# Altium PCB BRD9057A_SiWx917M_4-Layer_ExtSw_REF_DES_A01.PcbDoc (part 3 of 3)
Units mm, origin at the board's own origin, x right, y up, seen from the top; angles counter-clockwise.
Board outline 30 x 45 mm, 4 copper layers (Top Layer, Signal Layer 2, Signal Layer 3, Bottom Layer), stack 1.527 mm thick; 95 components, 97 nets, 386 pads, 413 vias.
Unrouted connection lines stored in the file: 15.
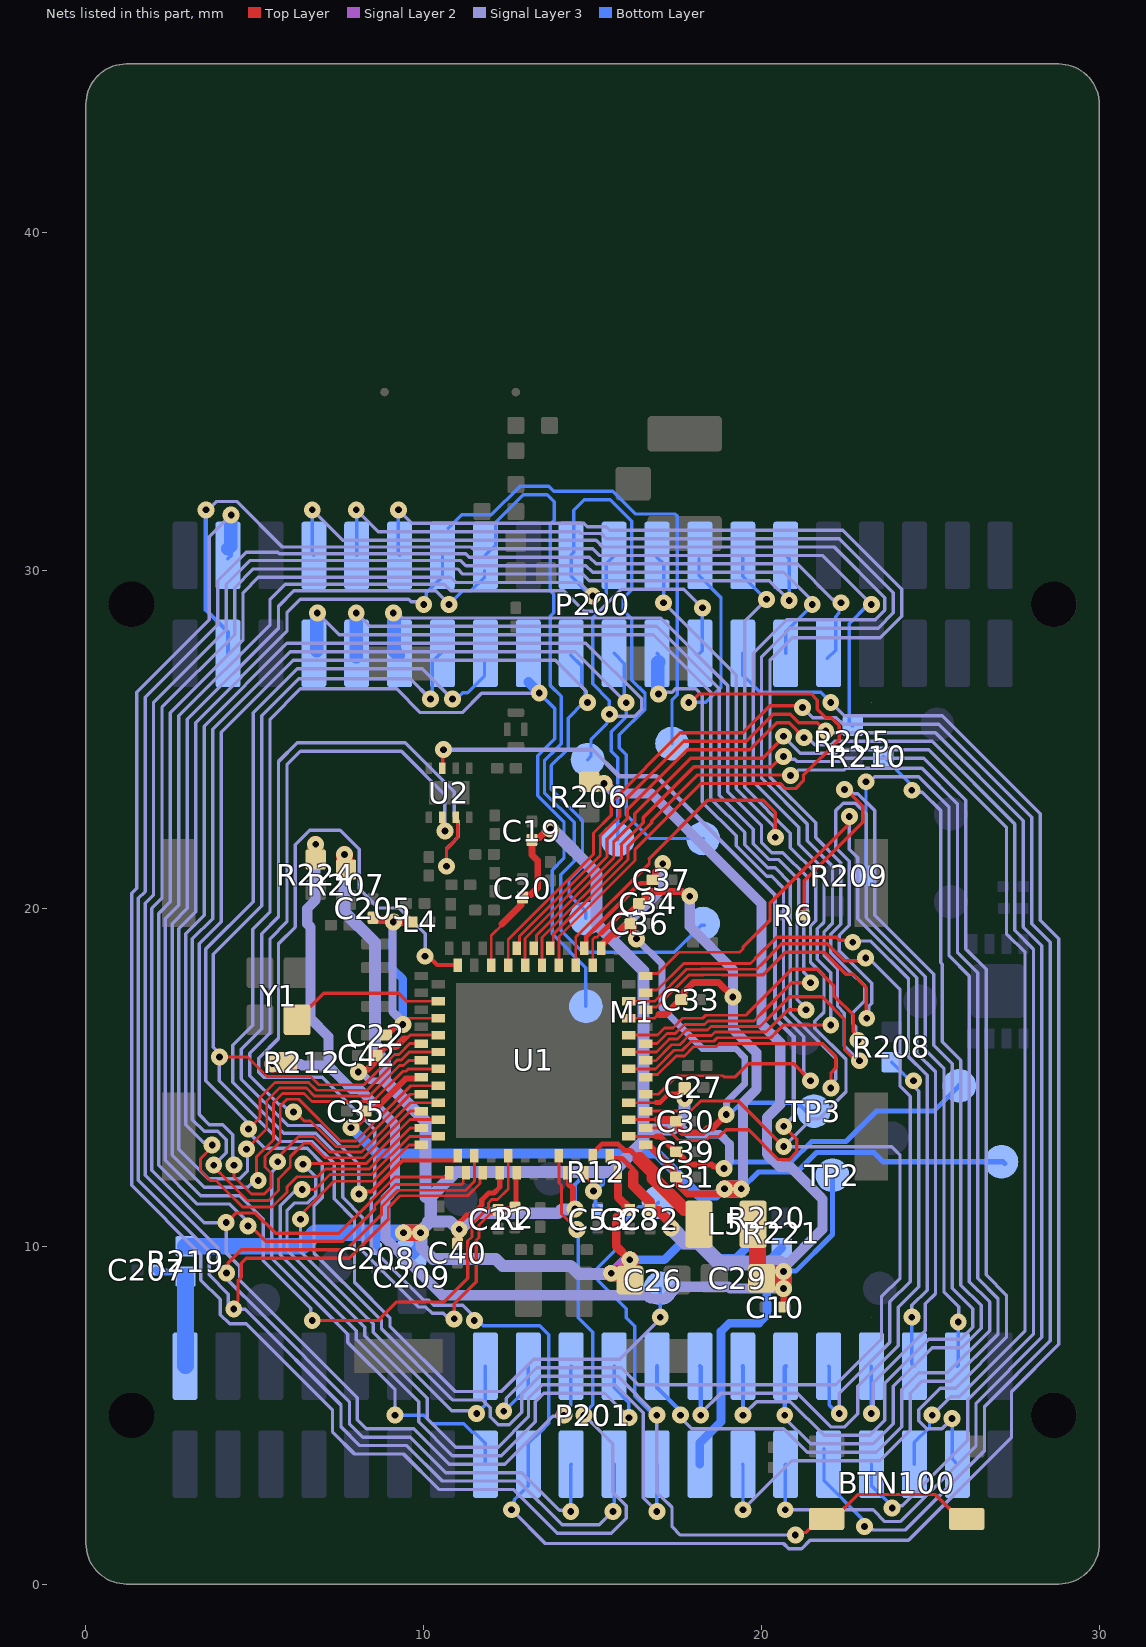
[diagram p4: the nets of this part, all layers, seen from the top]

## Via types
v1: diameter 0.5, hole 0.2, Top Layer to Bottom Layer, tented both sides, 372 vias
v2: diameter 0.5/0.5/0.5/0.5 (per signal layer), hole 0.2, Top Layer to Bottom Layer, tented both sides, 41 vias

## Nets (pads, with @x,y where several pads share a name; then routed paths per layer and width w, separated by ;. In a path a pad name is that pad's centre, name@x,y a point inside that pad or via, vN(x,y) a via of type N, cw(c..) or ccw(c..) an arc to the next point about the centre after c; other vN are vias at no path point) (continued)
NetU1_A19: U1.A19 U2.6 | length 23.3
  Top Layer w0.083: v1(6.145,13.975) 6.192,13.975 6.462,13.705 6.645,13.705 7.398,12.952 8.058,12.952 8.836,13.73 8.836,13.736 9.6,14.5 U1.A19@9.925,14.5
  Top Layer w0.1: U2.6@10.55,22.725 10.55,22.292 v1(10.627,22.292) v1@10.589,22.33 ; U2.6@10.575,22.7 U2.6@10.589,22.687
  Signal Layer 3 w0.1: v1(6.145,13.975) 6.037,13.975 5.829,14.184 5.716,14.184 4.85,15.05 4.85,15.717 5.45,16.317 5.45,19.1 5.95,19.6 5.95,24.25 6.35,24.65 9.341,24.65 10.627,23.364 v1(10.627,22.292)
NetU1_A35: U1.A35 U2.3 | length 25.5
  Top Layer w0.083: U1.A35@16.575,13.5 17.182,13.5 17.55,13.132 18.35,13.132 18.468,13.25 18.75,13.25
  Top Layer w0.1: U2.3@10.55,24.15 10.566,24.166 10.566,24.684 v1(10.583,24.701) ; 18.75,13.25 18.95,13.45 19.616,13.45 20.499,12.567 20.816,12.567 21.041,12.791 21.041,13.167 v1(20.658,13.55) v1@20.65,13.55
  Signal Layer 3 w0.127: v1@10.551,24.701 v1(10.583,24.701) 14.999,24.701 15.787,23.914 16.886,23.914 20.4,20.4 20.4,16.75 20.95,16.2 20.95,13.842 v1(20.658,13.55)
NetU1_B12: U1.B12 Y1.3 | length 4.6
  Top Layer w0.083: 9.499,17.25 U1.B12@10.425,17.25
  Top Layer w0.1: Y1.3@6.25,16.7 6.25,16.734 6.598,17.081 6.631,17.081 7.034,17.484 9.265,17.484 9.499,17.25
NetU1_B21: U1.B21 U2.7 | length 28.7
  Top Layer w0.1: v1(10.675,21.25) 10.675,21.775 11.01,22.11 11.01,22.45 11,22.46 11,22.65 U2.7@10.95,22.7
  Top Layer w0.127: v1(8.079,11.55) 8.151,11.621 8.455,11.621 9.373,12.538 10.938,12.538 11,12.6 U1.B21@11,12.675
  Signal Layer 3 w0.1: v1@8.1,11.55 8.079,11.571 8.079,12.421 6.925,13.575 5.975,13.575 4.6,14.95 4.6,15.834 5.2,16.434 5.2,19.25 5.7,19.75 5.7,24.35 6.25,24.9 9.45,24.9 10.9,23.45 10.9,22.725 11.025,22.6 11.025,22.459 11.027,22.457 11.027,22.126 10.793,21.892 10.675,21.775 v1(10.675,21.25)
POC_IN: C21.2 M1.TPJ17 P200.17 R2.2 U1.A27 | length 47.2
  Top Layer w0.083: 11.55,10.15 11.55,10.165 11.639,10.254 11.639,10.629 11.979,10.969 12.094,10.969 C21.2@12.2,11.075
  Top Layer w0.1: v1(10.9,7.85) 10.9,8.014 10.9,8.3 11.55,8.95 11.55,10.15
  Top Layer w0.15: C21.2@12.2,11.075 12.238,11.113 12.663,11.113 R2.2@12.7,11.15 ; R2.2@12.75,11.15 12.725,11.175 12.725,12.15 U1.A27@12.75,12.175
  Signal Layer 3 w0.1: v1(10.9,7.85) 10.823,7.927 10.665,7.927 10.577,8.014 10.252,8.014 10.066,8.2 9.85,8.2 8.2,9.85 8.2,10.85 7.6,11.45 7.6,12.55 6.8,13.35 5.85,13.35 4.35,14.85 4.35,15.95 4.937,16.537 4.937,19.386 5.45,19.9 5.45,25.6 6.35,26.5 9.2,26.5 9.9,25.8 11.134,25.8 11.71,26.375 v1@13.419,26.375
  Bottom Layer w0.1: v1(13.419,26.375) 13.875,25.919 13.875,25.025 13.373,24.523 13.373,23.342 14.15,22.566 14.15,21.484 13.8,21.134 13.8,19.25 14.801,18.249 M1.TPJ17@14.801,17.101
  Bottom Layer w0.3: P200.17@13.1,26.7 13.419,26.381 v1(13.419,26.375)
RADIO_F0: M1.TPJ1 P200.13 U1.A16 | length 46
  Top Layer w0.083: v1(3.95,15.6) 4.786,15.6 5.361,15.025 6.653,15.025 6.896,14.783 8.233,14.783 9.13,15.68 9.267,15.68 9.587,16 U1.A16@9.925,16
  Signal Layer 3 w0.1: v1(10.2,26.2) 9.6,26.8 6.3,26.8 5.2,25.7 5.2,20.085 3.763,18.648 3.763,15.895 3.95,15.708 v1(3.95,15.6) 3.95,14.9 5.75,13.1 6.7,13.1 7.35,12.45 7.35,11.4 7.95,10.8 7.95,9.1 7.95,8.934 9,7.884 9,7.634 10.934,5.7 12.3,5.7 13.25,6.65 15.8,6.65 17,7.85 v1(17,7.9)
  Bottom Layer w0.1: v1(10.2,26.2) 10.254,26.254 10.254,27.304 P200.13@10.55,27.6 ; v1(17,7.9) M1.TPJ1@17,8.752
RADIO_F1: M1.TPJ2 P200.14 U1.A17 | length 47.8
  Top Layer w0.083: v1(4.75,12.875) 5.35,13.475 5.35,14.3 5.734,14.684 6.525,14.684 6.758,14.451 8.385,14.451 9.282,15.348 9.404,15.348 9.557,15.5 U1.A17@9.925,15.5
  Signal Layer 3 w0.1: v1(4.75,12.875) 4.783,12.842 4.783,12.234 4.549,12 3.617,12 2.75,12.867 2.75,19.4 3.25,19.9 3.25,25.5 5.95,28.2 5.95,28.75 6.35,29.15 9.55,29.15 9.623,29.077 9.923,29.077 v1(10,29)
  Bottom Layer w0.1: v1(10,29) 10.077,29.077 10.077,29.342 10.555,29.82 P200.14@10.555,30.45 10.555,30.495 P200.14@10.55,30.5 ; P200.14@10.725,31.25 11.125,31.65 12,31.65 12.85,32.5 13.7,32.5 13.85,32.35 15.6,32.35 16.273,31.677 17.441,31.677 17.5,31.618 17.5,26.323 17.351,26.174 M1.TPJ2@17.351,24.881
RADIO_F2: BTN100.3 BTN100.4 M1.TPJ3 P200.15 U1.B15 | length 69.4
  Top Layer w0.083: v1(4.813,13.471) 5.15,13.808 5.15,14.4 5.6,14.85 6.593,14.85 6.827,14.617 8.317,14.617 9.214,15.514 9.335,15.514 9.572,15.75 U1.B15@10.425,15.75
  Top Layer w0.1: v1(21,1.45) 21.077,1.527 21.318,1.527 BTN100.3@21.717,1.925 ; BTN100.3@21.925,1.925 22.125,1.925 22.85,2.65 25.15,2.65 25.875,1.925 BTN100.4@26.075,1.925
  Signal Layer 3 w0.1: v1@4.779,13.437 4.779,13.412 5.29,12.9 6.55,12.9 7,12.45 7,11.432 6.75,11.182 6.75,9.8 8.536,8.014 8.75,7.8 8.75,7.55 10.85,5.45 11.733,5.45 11.967,5.216 11.967,4.951 12.201,4.717 12.533,4.717 12.9,5.084 12.9,5.617 13.433,6.15 15.75,6.15 v1(16.9,5) 16.9,2.716 17.066,2.55 17.35,2.266 17.35,1.7 17.6,1.45 v1(21,1.45) ; v1(4.813,13.471) 4.736,13.548 4.736,13.714 4.205,14.245 3.55,14.9 3.55,18.8 4.95,20.2 4.95,24.759 4.95,25.8 6.25,27.1 9.95,27.1 v1(10.85,26.2)
  Bottom Layer w0.1: v1(10.85,26.2) 10.958,26.2 11.149,26.391 11.296,26.391 11.8,26.895 P200.15@11.8,27.35 ; v1(16.9,5) 16.816,5 16.25,5.566 16.25,7.634 16,7.884 16,8.014 16,8.15 15.15,9 15.15,9.366 15.65,9.866 15.65,10.45 16.365,11.165 16.815,11.165 M1.TPJ3@16.949,11.3
RADIO_F3: M1.TPJ4 P200.16 U1.B16 | length 57.4
  Top Layer w0.083: v1(5.1,11.95) 5.05,12 5.05,12.65 5.55,13.15 5.55,14.25 5.818,14.518 6.456,14.518 6.689,14.285 8.485,14.285 9.382,15.182 9.473,15.182 9.541,15.25 U1.B16@10.425,15.25
  Signal Layer 3 w0.1: v1(5.1,11.95) 4.992,11.95 4.792,11.75 3.5,11.75 2.55,12.7 2.55,19.55 3,20 3,25.6 5.7,28.3 5.7,28.95 6.15,29.4 10.35,29.4 v1(10.75,29)
  Bottom Layer w0.1: v1(10.75,29) 11.15,29.4 11.392,29.4 11.8,29.808 P200.16@11.8,30 ; P200.16@11.825,30.45 12.13,30.755 12.13,31.43 12.95,32.25 13.65,32.25 13.862,32.038 13.862,31.486 13.75,31.374 13.75,29.4 13.85,29.3 13.85,28.75 13.75,28.65 13.75,26.6 14.075,26.275 14.075,24.875 13.959,24.759 13.573,24.373 13.573,23.452 13.575,23.45 ; 13.573,23.425 14.45,22.549 14.45,21.4 14.05,21 14.05,19.35 14.7,18.7 17.418,18.7 18.218,19.5 M1.TPJ4@18.3,19.5
RADIO_F6: M1.TPJ5 P200.19 U1.B17 | length 45.8
  Top Layer w0.083: v1(4.383,12.4) 4.383,12.067 4.9,11.55 5.28,11.55 5.475,11.745 5.475,12.17 5.3,12.345 5.3,12.655 5.75,13.105 5.75,14.15 5.95,14.35 6.3,14.35 7.532,13.118 7.989,13.118 8.67,13.799 8.67,13.805 9.616,14.75 U1.B17@10.425,14.75
  Signal Layer 3 w0.1: v1(4.383,12.4) 4.35,12.433 4.35,13.3 4.051,13.599 3.651,13.599 3.35,13.9 3.35,18.95 4,19.6 4,25.216 6.134,27.35 13.9,27.35 14.817,26.433 14.817,26.133 v1(14.85,26.1)
  Bottom Layer w0.1: P200.19@14.35,27.5 14.67,27.18 14.67,26.58 14.773,26.477 14.773,26.177 v1(14.85,26.1) 14.742,26.1 14.275,25.633 14.275,24.759 14.275,24.734 13.773,24.233 13.773,23.527 14.7,22.6 14.7,21.25 14.3,20.85 14.3,20.411 14.801,19.91 M1.TPJ5@14.801,19.702
RADIO_F7: M1.TPJ6 P200.20 U1.A24 | length 56.9
  Top Layer w0.083: 8.55,11.1 8.55,11.214 9.162,11.825 11.118,11.825 11.166,11.874 11.166,12.092 U1.A24@11.25,12.175
  Top Layer w0.1: v1(4.8,10.6) 4.866,10.6 5.316,10.15 7.6,10.15 8.55,11.1
  Signal Layer 3 w0.1: v1(4.8,10.6) 4.8,10.708 4.258,11.25 4.205,11.25 3.3,11.25 2.15,12.4 2.15,19.85 2.5,20.2 2.5,25.8 4.65,27.95 4.65,29.35 5.1,29.8 10.8,29.8 10.95,29.65 14.6,29.65 v1(15,29.25)
  Bottom Layer w0.1: P200.20@14.357,30.457 14.441,30.541 14.441,31.791 14.75,32.1 15.524,32.1 16.155,31.469 16.155,29.431 15.9,29.176 15.9,28.824 16.155,28.569 16.155,26.761 16.55,26.366 16.55,25.9 15.791,25.141 15.791,24.759 16,24.55 16,22.767 16.695,22.072 M1.TPJ6@18.27,22.072 ; P200.20@14.365,30.45 14.365,29.833 14.948,29.25 v1(15,29.25)
RADIO_F8: M1.TPJ7 P200.21 U1.A20 | length 42.3
  Top Layer w0.083: v1(3.783,12.4) 3.783,12.353 4.205,11.931 4.786,11.35 5.4,11.35 5.7,11.65 5.7,11.996 6.049,12.345 6.049,12.649 6.45,13.05 6.65,13.05 7.08,12.62 8.22,12.62 9.6,14 U1.A20@9.925,14
  Signal Layer 3 w0.1: v1(3.783,12.4) 4.15,12.767 4.15,13.15 3.901,13.399 3.501,13.399 3.15,13.75 3.15,19.1 3.75,19.7 3.75,25.3 6.05,27.6 14.485,27.6 v1(15.993,26.093)
  Bottom Layer w0.1: P200.21@15.635,27.55 15.937,27.248 15.937,26.063 v1@15.993,26.007 ; M1.TPJ7@15.74,22.031 15.74,24.46 15.55,24.65 15.55,24.759 15.55,25.233 15.993,25.676 v1@15.993,26.007 ; v1@16,26.1 v1(15.993,26.093) v1@15.993,26.007 ; v1@16.05,25.95 v1@15.993,26.007
RADIO_F9: M1.TPJ8 P200.22 U1.A21 | length 44.8
  Top Layer w0.083: v1(3.735,12.999) 3.735,12.935 3.392,12.592 3.392,12.238 3.679,11.95 3.85,11.95 4.205,11.595 4.643,11.157 5.507,11.157 5.95,11.6 5.95,11.761 6.245,12.055 6.855,12.055 7.088,12.288 8.387,12.288 9.599,13.5 U1.A21@9.925,13.5
  Signal Layer 3 w0.1: v1(3.735,12.999) 3.659,13.075 3.475,13.075 2.95,13.6 2.95,19.25 3.5,19.8 3.5,25.4 5.95,27.85 14.801,27.85 16.45,26.201 16.45,25.9 16.243,25.693 15.556,25.693 v1(15.5,25.749)
  Bottom Layer w0.1: M1.TPJ8@14.851,24.401 14.95,24.5 14.95,24.759 14.95,25 15.423,25.473 15.423,25.672 v1(15.5,25.749) ; v1(15.5,25.749) 15.497,25.753 15.497,26.15 15,26.646 15,28.604 15.4,29.004 15.4,30.2 P200.22@15.65,30.45
RADIO_F10: P200.23 U1.A37 | length 21.9
  Top Layer w0.083: U1.A37@16.575,14.5 16.955,14.5 17.505,15.05 18.859,15.05 18.859,15.046 18.903,15.003
  Top Layer w0.1: 18.901,15.008 19.208,15.008 19.6,15.4 20.949,15.4 v1(21.449,14.899)
  Signal Layer 3 w0.1: v1(16.95,26.35) 17.006,26.406 17.35,26.406 17.444,26.5 18.05,26.5 18.25,26.3 18.25,24.759 ; 18.25,24.75 18.25,23.15 19.25,22.15 19.25,21.851 20.151,20.95 20.3,20.95 20.65,20.6 20.65,16.802 21.25,16.202 21.25,15.158 21.449,14.958 v1(21.449,14.899)
  Bottom Layer w0.1: P200.23@16.905,27.55 16.95,27.505 16.95,27.3 v1(16.95,26.35)
  Bottom Layer w0.4: v1(16.95,26.35) 16.931,26.369 16.931,27.281 P200.23@16.95,27.3
RADIO_F11: P200.24 U1.B3 | length 19.1
  Top Layer w0.083: U1.B3@14.5,18.325 14.5,19.15 16.675,21.325 16.675,21.475
  Top Layer w0.1: 16.675,21.475 18.4,23.2 20.05,23.2 20.408,22.842 v1(20.408,22.108)
  Signal Layer 3 w0.1: v1(17.1,29.05) 19.25,26.9 19.25,24.759 19.25,23.55 20.367,22.433 20.367,22.149 v1(20.408,22.108)
  Bottom Layer w0.1: P200.24@16.9,30.4 17.1,30.2 v1(17.1,29.05)
RADIO_F12: P200.25 U1.B24 | length 49.6
  Top Layer w0.083: 11.3,10.15 11.424,10.274 11.424,10.649 11.916,11.14 11.916,11.283 12.012,11.38 12.18,11.38 12.5,11.7 U1.B24@12.5,12.675
  Top Layer w0.1: v1(6.7,7.8) 8.65,7.8 8.864,8.014 9.2,8.35 10.6,8.35 11.3,9.05 11.3,10.15
  Signal Layer 3 w0.1: v1(6.7,7.8) 6.654,7.846 6.654,8.014 6.654,8.162 5.25,9.566 5.25,10.8 4.55,11.5 3.4,11.5 2.35,12.55 2.35,19.7 2.75,20.1 2.75,25.7 5.45,28.4 5.45,29.15 5.9,29.6 10.6,29.6 10.8,29.4 12.287,29.4 14.15,29.4 14.75,28.8 15.2,28.8 15.85,29.45 17.7,29.45 v1(18.25,28.9)
  Bottom Layer w0.1: P200.25@18.175,27.55 18.25,27.625 v1(18.25,28.9)
RADIO_F13: P200.26 U1.B4 | length 22.7
  Top Layer w0.083: U1.B4@14,18.325 14,18.9 14,19.168 16.25,21.418 16.25,21.741 16.279,21.771
  Top Layer w0.1: 16.279,21.771 18.209,23.7 20.55,23.7 20.7,23.55 20.85,23.55 20.851,23.551 21.016,23.551 21.241,23.775 21.241,23.941 22.3,25 22.3,25.25 22.3,25.416 22.066,25.65 21.9,25.65 21.65,25.9 21.65,26.166 21.466,26.35 18.162,26.35 17.912,26.1 v1(17.846,26.1)
  Bottom Layer w0.1: v1(17.846,26.1) 18.35,26.1 18.8,26.55 18.8,29.195 18.15,29.845 P200.26@18.15,30.35
RADIO_F14: P200.27 P201.17 U1.B10 | length 81.6
  Top Layer w0.127: v1(10.039,18.587) 10.139,18.587 10.401,18.325 U1.B10@11,18.325
  Signal Layer 3 w0.1: v1(10.039,18.587) 10.039,19.246 9.271,20.013 8.652,20.013 8.087,20.579 8.087,21.748 7.521,22.313 6.629,22.313 6.2,21.885 6.2,19.45 5.7,18.95 5.7,16.15 5.116,15.566 5.116,15.151 5.267,15 7,15 8.05,13.95 8.55,13.45 8.55,11.5 8.45,11.4 8.45,9.95 10,8.4 10.149,8.4 10.299,8.25 11.155,8.25 11.391,8.014 11.498,7.907 v1(11.498,7.799) ; v1(12.6,2.2) 13.6,1.2 20.65,1.2 20.8,1.05 21.184,1.05 21.434,1.3 24.35,1.3 27.4,4.35 27.4,5.7 28.8,7.1 28.8,19.1 28.25,19.65 28.25,22.8 25.35,25.7 22.45,25.7 v1(22.05,26.1)
  Bottom Layer w0.1: v1(11.498,7.799) 11.606,7.799 11.755,7.65 13.434,7.65 13.7,7.384 13.7,4.754 13.446,4.5 13.428,4.5 13.095,4.167 P201.17@13.095,3.55 13.095,2.907 12.677,2.489 12.677,2.277 v1(12.6,2.2) ; P200.27@19.445,27.55 19.445,26.907 19.765,26.587 19.765,26.585 19.954,26.396 21.754,26.396 v1(22.05,26.1)
RADIO_F15: P200.28 P201.18 U1.A36 | length 48.8
  Top Layer w0.083: U1.A36@16.575,14 17.9,14 18.2,14.3 19.15,14.3
  Top Layer w0.1: 19.15,14.3 19.308,14.3 20.6,13.008 v1@20.6,12.9
  Signal Layer 3 w0.1: v1(12.367,5.117) 12.444,5.194 12.444,5.494 13.35,6.4 15.85,6.4 16.35,5.9 22.2,5.9 23.55,7.25 23.55,8.5 24.1,9.05 24.1,12.7 23.85,12.95 v1(20.658,12.95) 21.481,13.773 21.705,13.773 22.5,14.569 22.5,15.533 21.576,16.456 21.576,16.661 21.85,16.934 21.85,18 21.45,18.4 21.45,19.481 21.6,19.631 ; v1@20.1,29.15 20.1,29.1 19.5,28.5 19.5,23.583 20.85,22.233 20.85,21.8 21.6,21.05 21.6,19.65
  Bottom Layer w0.1: v1(12.367,5.117) 12.38,5.117 13.095,5.832 P201.18@13.095,6.45 ; P200.28@19.445,30.45 19.445,29.833 20.128,29.15 v1(20.15,29.15)
RADIO_F16: P200.29 P201.19 U1.B22 | length 66.9
  Top Layer w0.083: 8.75,10.95 8.75,11.179 9.23,11.659 9.409,11.659 11.235,11.659 11.499,11.923 U1.B22@11.5,12.675
  Top Layer w0.1: v1(4.158,9.208) 4.205,9.255 4.216,9.266 4.216,9.516 4.6,9.9 7.7,9.9 8.75,10.95
  Signal Layer 3 w0.1: v1(4.158,9.208) 4.205,9.161 4.234,9.131 4.234,8.966 5.186,8.014 7.8,5.4 7.8,4.75 8.2,4.35 9.6,4.35 10.65,3.3 12.9,3.3 14.017,2.183 14.317,2.183 v1(14.35,2.15) ; v1@4.166,9.2 4.133,9.2 3.9,9.433 3.9,9.95 1.75,12.1 1.75,20.15 2,20.4 2,26.1 4.15,28.25 4.15,29.6 4.85,30.3 11.1,30.3 11.25,30.15 14.8,30.15 15,29.95 20.658,29.95 21.5,29.108 v1(21.5,29)
  Bottom Layer w0.1: v1(14.35,2.15) 14.35,3.535 P201.19@14.365,3.55 ; P200.29@20.715,27.55 20.715,28.193 21.5,28.978 v1(21.5,29)
RADIO_F17: P200.30 P201.20 U1.A23 | length 63.5
  Top Layer w0.083: 8.35,11.25 9.15,12.05 10.666,12.05 10.75,12.133 U1.A23@10.75,12.175
  Top Layer w0.1: v1(4.15,10.7) 4.205,10.755 4.433,10.983 5.017,10.983 5.618,10.382 7.482,10.382 8.35,11.25
  Signal Layer 3 w0.1: v1(14.148,4.999) 14.114,4.965 13.815,4.965 12.4,3.55 10.75,3.55 9.7,4.6 8.3,4.6 8.033,4.867 8.033,5.517 5.536,8.014 4.558,8.992 4.558,9.374 4.55,9.381 4.55,9.4 4.205,9.745 4.15,9.8 v1(4.15,10.7) 3.5,10.7 1.95,12.25 1.95,20 2.25,20.3 2.25,25.95 4.4,28.1 4.4,29.5 4.95,30.05 11,30.05 11.15,29.9 14.7,29.9 14.9,29.7 20.234,29.7 v1(20.817,29.117)
  Bottom Layer w0.1: v1(14.148,4.999) 14.148,5.098 14.35,5.3 14.35,6.435 P201.20@14.365,6.45 ; P200.30@20.715,30.45 20.817,30.348 v1(20.817,29.117)
RADIO_F18: P200.31 P201.21 U1.A25 | length 71.1
  Top Layer w0.083: 8.95,10.8 8.95,11.141 9.302,11.493 11.304,11.493 11.665,11.855 11.665,11.968 11.666,11.969 11.666,12.092 U1.A25@11.75,12.175
  Top Layer w0.1: v1(4.375,8.141) 4.375,8.249 4.5,8.374 4.5,8.984 4.6,9.084 4.6,9.5 4.75,9.65 7.8,9.65 8.95,10.8
  Signal Layer 3 w0.1: v1(15.6,2.15) 15.2,1.75 14.1,1.75 12.8,3.05 10.55,3.05 9.5,4.1 8.1,4.1 7.55,4.65 7.55,5.3 4.836,8.014 4.716,8.134 4.382,8.134 v1(4.375,8.141) 4.338,8.104 4.338,8.05 4.25,8.05 4.217,8.083 4.217,8.583 3.65,9.15 3.65,9.85 1.55,11.95 1.55,20.3 1.75,20.5 1.75,26.25 3.9,28.4 3.9,29.7 4.75,30.55 5.68,30.55 5.73,30.5 11.25,30.5 11.35,30.4 14.9,30.4 15.1,30.2 21.05,30.2 22.092,29.158 22.134,29.158 22.242,29.05 v1(22.35,29.05)
  Bottom Layer w0.1: v1(15.6,2.15) 15.635,2.185 P201.21@15.635,3.55 ; P200.31@21.95,27.4 22.191,27.641 22.191,28.641 22.292,28.742 22.292,28.992 v1(22.35,29.05)
RADIO_P12: P201.15 U1.B18 | length 18.7
  Top Layer w0.083: v1(5.674,12.5) 5.674,12.613 5.789,12.728 5.789,12.739 6.3,13.25 6.75,13.25 7.214,12.786 8.151,12.786 9.616,14.25 U1.B18@10.425,14.25
  Signal Layer 3 w0.1: v1(5.674,12.5) 5.598,12.423 5.598,12.289 5.5,12.191 5.5,9.65 7.136,8.014 7.75,7.4 7.75,7.15 9.15,5.75 v1(9.15,5)
  Bottom Layer w0.1: v1(9.15,5) 10,5 10.25,4.75 11.18,4.75 11.445,4.485 11.507,4.485 11.825,4.167 P201.15@11.825,3.55
RADIO_P13: P201.16 U1.A22 | length 14.4
  Top Layer w0.083: v1(6.35,10.798) 6.35,10.911 6.466,11.027 6.466,11.046 7.345,11.924 8.493,11.924 9.568,13 U1.A22@9.925,13
  Signal Layer 3 w0.1: v1(6.35,10.798) 6.35,9.85 8.186,8.014 8.5,7.7 8.5,7.45 10.823,5.127 11.491,5.127 v1(11.567,5.05)
  Bottom Layer w0.1: v1(11.567,5.05) 11.575,5.05 11.825,5.3 P201.16@11.825,6.45
RADIO_P19: P201.22 U1.B20 | length 23.4
  Top Layer w0.083: v1(6.4,11.681) 6.781,11.681 7.222,12.122 8.455,12.122 9.583,13.25 U1.B20@10.425,13.25
  Signal Layer 3 w0.1: v1(6.4,11.681) 6.292,11.681 6.211,11.6 6.15,11.6 5.75,11.2 5.75,9.75 7.486,8.014 8,7.5 8,7.25 9.85,5.4 9.85,4.8 10.85,3.8 12.3,3.8 13.3,4.8 13.3,5.4 13.55,5.65 15.351,5.65 v1(16.076,4.926)
  Bottom Layer w0.1: P201.22@15.635,6.45 15.635,5.807 16.073,5.369 16.073,4.928 v1(16.076,4.926)
RADIO_P20: P201.23 U1.B19 | length 27.2
  Top Layer w0.083: v1(6.423,12.43) 6.447,12.454 8.298,12.454 9.594,13.75 U1.B19@10.425,13.75
  Signal Layer 3 w0.1: v1(6.423,12.43) 6.8,12.053 6.8,11.515 6.566,11.281 6.181,11.281 5.95,11.05 5.95,9.9 7.836,8.014 8.25,7.6 8.25,7.35 10.1,5.5 10.1,4.9 10.95,4.05 12.2,4.05 13.1,4.95 13.1,5.5 13.5,5.9 15.667,5.9 16.5,5.067 16.5,2.55 v1(16.9,2.15)
  Bottom Layer w0.1: v1(16.9,2.15) 16.9,3.545 P201.23@16.905,3.55
RADIO_P21: P201.24 R209.2 | length 35.2
  Signal Layer 3 w0.1: v1(17.6,5) 17.6,4.935 17.935,4.6 20.65,4.6 21.35,3.9 23.4,3.9 24.15,4.65 24.15,5.75 24.65,6.25 25.5,6.25 26.75,7.5 26.75,8.35 26.15,8.95 26.15,18 25.55,18.6 25.55,23 24.65,23.9 23.352,23.9 23.202,23.75 v1(23.094,23.75)
  Bottom Layer w0.1: R209.2@23.046,20.964 23.094,21.012 v1(23.094,23.75)
  Bottom Layer w0.127: P201.24@16.905,6.45 16.905,5.814 17.529,5.191 17.529,5.071 v1(17.6,5)
RADIO_P22: P201.25 R221.1 | length 7.9
  Bottom Layer w0.254: P201.25@18.175,3.55 18.175,4.18 18.8,4.805 18.8,7.475 19.05,7.725 19.925,7.725 20.15,7.95 20.15,8.014 20.15,9.5 R221.1@20.6,9.95
RADIO_P23: P201.26 R208.2 | length 18.5
  Signal Layer 3 w0.1: v1(18.2,5) 18.2,5.05 18.8,5.65 21.05,5.65 22.05,4.65 22.466,4.65 22.85,5.034 22.85,5.85 24.05,7.05 24.05,8.2 24.65,8.8 24.65,14.591 24.577,14.665 24.577,14.823 v1(24.5,14.9)
  Bottom Layer w0.1: R208.2@23.85,15.45 23.855,15.45 24.405,14.9 v1(24.5,14.9)
  Bottom Layer w0.127: P201.26@18.175,6.45 18.2,6.425 v1(18.2,5)
RADIO_P24: P201.27 U1.A5 | length 43
  Top Layer w0.083: U1.A5@13.75,18.825 13.833,18.908 13.833,19.236 16.05,21.452 16.05,21.841 16.079,21.871
  Top Layer w0.1: 16.079,21.871 16.75,22.541 16.75,22.6 18.1,23.95 20.842,23.95 v1(20.858,23.934)
  Signal Layer 3 w0.1: v1@19.45,2.3 19.55,2.3 20.9,3.65 23.5,3.65 24.4,4.55 24.4,5.65 24.608,5.858 ; v1@20.85,23.95 20.95,23.95 21.1,24.1 22.45,24.1 22.5,24.15 24.75,24.15 25.8,23.1 25.8,18.7 26.4,18.1 26.4,9.05 27,8.45 27,7.4 25.6,6 24.75,6 24.6,5.85
  Bottom Layer w0.1: P201.27@19.445,3.55 19.45,3.545 v1(19.45,2.2)
RADIO_P25: P201.28 R6.2 | length 33.1
  Top Layer w0.1: R6.2@21.25,19.8 21.264,19.814 21.264,20.818 21.78,21.334 23,22.554 23,23.021 22.501,23.519 v1(22.458,23.519)
  Signal Layer 3 w0.1: v1@19.45,5.05 19.5,5.05 19.85,5.4 20.85,5.4 21.85,4.4 23.2,4.4 23.65,4.85 23.65,5.95 24.95,7.25 25.9,7.25 26.25,7.6 26.25,8.15 25.65,8.75 25.65,15.4 25.1,15.95 25.1,18.05 23.35,19.8 23.35,22.9 22.85,23.4 22.716,23.4 22.71,23.406 22.679,23.406 22.566,23.519 v1(22.458,23.519)
  Bottom Layer w0.127: P201.28@19.445,6.45 19.45,6.445 v1(19.45,5)
RADIO_P26: P201.29 U1.A7 | length 47.2
  Top Layer w0.083: U1.A7@12.75,18.825 12.833,18.908 12.833,19.031 12.834,19.032 12.834,19.176 15.225,21.566 15.225,22.15
  Top Layer w0.1: 15.225,22.15 15.8,22.725 15.8,23.05 17.7,24.95 19.55,24.95 20.35,25.75 20.85,25.75 21.1,25.5 21.65,25.5 v1(21.9,25.25)
  Signal Layer 3 w0.1: v1(20.7,2.2) 23.3,2.2 23.65,1.85 24.1,1.85 26.35,4.1 26.35,5.35 28.3,7.3 28.3,18.9 27.75,19.45 27.75,22.6 25.15,25.2 v1@22.123,25.2
  Bottom Layer w0.1: v1(20.7,2.2) 20.7,3.535 P201.29@20.715,3.55
RADIO_P27: P201.30 R210.2 | length 28
  Signal Layer 3 w0.1: v1(20.686,4.998) 20.686,4.914 21.45,4.15 23.3,4.15 23.9,4.75 23.9,5.85 25.05,7 25.933,7 26.5,7.567 26.5,8.25 25.9,8.85 25.9,15.5 25.35,16.05 25.35,18.35 25.3,18.4 25.3,22.9 24.758,23.442 24.508,23.442 v1(24.45,23.5)
  Bottom Layer w0.1: R210.2@23.6,24.5 24.373,23.727 24.373,23.577 v1(24.45,23.5)
  Bottom Layer w0.127: v1(20.686,4.998) 20.686,6.421 P201.30@20.715,6.45
RADIO_P28: P201.31 U1.B7 | length 48.3
  Top Layer w0.083: U1.B7@12.5,18.325 12.5,19.076 15.028,21.604 15.028,22.237 15.55,22.759
  Top Layer w0.1: 15.55,22.759 15.55,23.15 17.6,25.2 19.45,25.2 20.25,26 21.15,26 v1@21.2,25.95 ; v1@21.139,26.027 v1(21.216,25.95)
  Signal Layer 3 w0.1: v1(21.216,25.95) 21.516,25.65 22.217,25.65 22.417,25.45 25.25,25.45 28,22.7 28,19.55 28.55,19 28.55,7.2 26.6,5.25 26.6,3.95 24.25,1.6 23.309,1.6 23.285,1.623 23.127,1.623 v1(23.05,1.7)
  Bottom Layer w0.1: P201.31@21.85,4 21.85,3.055 22.973,1.932 22.973,1.777 v1(23.05,1.7)
RADIO_P29: P201.32 U1.B39 | length 24.5
  Top Layer w0.083: U1.B39@16.075,17.251 16.827,17.251 17.776,18.2 18.203,18.2 18.208,18.204 18.892,18.204 18.897,18.2 19.85,18.2 19.972,18.322
  Top Layer w0.1: 19.972,18.322 20.6,18.95 21.95,18.95 22.444,18.456 23.006,18.456 v1(23.082,18.532)
  Signal Layer 3 w0.1: v1(22.3,5.05) 22.3,5.65 23.8,7.15 23.8,8.35 24.4,8.95 24.4,14.434 24.1,14.734 24.1,17.6 23.168,18.532 v1(23.082,18.532)
  Bottom Layer w0.1: P201.32@21.985,6.45 22,6.435 22,5.3 22.25,5.05 v1(22.3,5.05)
RADIO_P30: P201.33 U1.B6 | length 43.6
  Top Layer w0.083: U1.B6@13,18.325 13,19.107 15.425,21.532 15.425,22.05
  Top Layer w0.1: 15.425,22.05 16.025,22.65 16.025,22.925 17.8,24.7 19.65,24.7 20.447,25.497 20.816,25.497 v1(21.256,25.056)
  Signal Layer 3 w0.1: v1@21.25,25.05 21.371,25.05 21.571,24.85 22.066,24.85 22.166,24.95 25.05,24.95 27.5,22.5 27.5,19.35 28.05,18.8 28.05,7.4 26.1,5.45 26.1,4.25 24.166,2.316 23.931,2.316 v1(23.866,2.25)
  Bottom Layer w0.1: P201.33@23.255,3.55 23.255,2.907 23.866,2.296 v1(23.866,2.25)
RADIO_P31: P201.34 U1.A44 | length 29.3
  Top Layer w0.083: U1.A44@16.575,18 16.647,18.072 16.928,18.072 17.558,18.702 19.352,18.702 19.45,18.8
  Top Layer w0.1: 19.45,18.8 19.45,18.85 20.25,19.65 20.25,20.15 22.529,22.429 22.529,22.648 v1(22.6,22.719)
  Signal Layer 3 w0.1: v1(22.6,22.719) 22.6,21.75 22.85,21.5 22.85,19.699 24.6,17.949 24.6,15.716 25.15,15.166 25.15,8.6 24.85,8.3 24.85,7.5 23.308,5.958 23.308,5.058 v1@23.3,5.05
  Bottom Layer w0.1: v1(23.25,5.05) 23.25,6.445 P201.34@23.255,6.45
RADIO_P32: P201.35 U1.A6 | length 39
  Top Layer w0.083: U1.A6@13.25,18.825 13.333,18.908 13.333,19.205 15.625,21.497 15.625,21.975
  Top Layer w0.1: 15.625,21.975 16.25,22.6 16.25,22.8 17.9,24.45 20.032,24.45 20.65,25.068 v1(20.65,25.097)
  Signal Layer 3 w0.1: v1(20.65,25.097) 20.987,24.759 ; 20.998,24.748 21.147,24.6 22.2,24.6 22.3,24.7 24.95,24.7 27.25,22.4 27.25,19.25 27.8,18.7 27.8,7.5 25.85,5.55 25.6,5.55 v1(25.05,5)
  Bottom Layer w0.1: P201.35@24.525,3.55 24.525,4.192 24.973,4.64 24.973,4.923 v1(25.05,5)
RADIO_P33: P201.36 U1.A43 | length 20.9
  Top Layer w0.083: U1.A43@16.575,17.5 16.658,17.583 16.908,17.583 17.695,18.37 19.67,18.37 19.805,18.505
  Top Layer w0.1: 19.805,18.505 20.45,19.15 22.21,19.15 22.3,19.06 22.64,19.06 v1(22.7,19)
  Signal Layer 3 w0.1: v1(22.7,19) 22.735,19.035 23.23,19.035 24.35,17.916 24.35,15.616 24.85,15.116 24.9,15.066 24.9,8.7 24.45,8.25 v1(24.45,7.9)
  Bottom Layer w0.1: v1(24.45,7.9) 24.45,6.525 P201.36@24.525,6.45
RADIO_P34: P201.37 U1.B5 | length 39.4
  Top Layer w0.083: U1.B5@13.5,18.325 13.5,19.137 15.85,21.487 15.85,21.9
  Top Layer w0.1: 15.85,21.9 16.493,22.543 16.493,22.693 18,24.2 20.301,24.2 20.598,24.497 v1(20.65,24.497)
  Signal Layer 3 w0.1: v1(20.65,24.497) 20.727,24.42 20.98,24.42 21.05,24.35 22.35,24.35 22.45,24.45 24.8,24.45 26.05,23.2 26.05,18.8 26.65,18.2 26.65,9.15 27.25,8.55 27.25,7.3 25.75,5.8 25.284,5.8 24.65,5.166 24.65,4.834 24.884,4.6 25.342,4.6 v1(25.642,4.9) ; v1@25.605,4.9 v1(25.642,4.9) ; v1@25.65,4.9 v1(25.642,4.9)
  Bottom Layer w0.1: v1(25.642,4.9) 25.642,3.703 P201.37@25.795,3.55
RADIO_P35: P201.38 U1.A42 | length 34.1
  Top Layer w0.083: U1.A42@16.575,17 16.658,17.083 16.894,17.083 17.845,18.034 18.272,18.034 18.276,18.038 18.824,18.038 18.828,18.034 19.984,18.034 19.988,18.038
  Top Layer w0.1: 19.988,18.038 20.047,18.038 20.709,18.7 21.78,18.7 21.85,18.7 22.5,18.05 22.714,18.05 23.105,17.659 23.105,16.758 v1(23.113,16.749)
  Signal Layer 3 w0.1: 22.2,22.885 22.2,21.8 22.6,21.4 22.6,19.5 22.3,19.2 22.3,18.749 23.264,17.785 23.264,17.197 23.177,17.109 23.177,16.813 v1(23.113,16.749) ; 22.2,22.885 22.2,22.9 22.419,23.119 22.781,23.119 23.1,22.8 23.1,19.731 24.85,17.981 24.85,15.816 25.4,15.266 25.4,8.65 25.842,8.208 25.842,7.776 v1(25.824,7.759)
  Bottom Layer w0.1: P201.38@25.795,6.45 25.824,6.48 v1(25.824,7.759)
RADIO_P36: P200.3 R205.2 | length 29.5
  Signal Layer 3 w0.1: v1@3.569,31.75 3.867,32.048 4.464,32.048 5.812,30.7 11.4,30.7 11.45,30.65 15,30.65 15.2,30.45 21.8,30.45 v1(23.25,29)
  Bottom Layer w0.1: R205.2@22.7,25.4 22.6,25.5 22.6,28.434 23.166,29 v1(23.25,29)
  Bottom Layer w0.127: v1(3.55,31.8) 3.55,28.835 4.205,28.18 P200.3@4.205,27.55
RADIO_P37: P200.4 U1.B27 | length 54.5
  Top Layer w0.083: U1.B27@14,12.674 14,11.877 14.082,11.796 14.082,10.962 14.534,10.51 v1(14.534,10.5)
  Signal Layer 3 w0.1: v1(4.298,31.648) 3.65,31 3.65,28.55 1.5,26.4 1.5,20.6 1.35,20.45 1.35,11.8 3.4,9.75 3.4,9 3.975,8.425 3.975,7.975 4.25,7.7 4.75,7.7 7.3,5.15 7.3,4.5 7.95,3.85 9.4,3.85 10.45,2.8 12.65,2.8 13.95,1.5 15.55,1.5 16,1.95 16,2.2 16,2.316 15.6,2.716 15.6,4.152 14.752,5 v1(14.748,5)
  Bottom Layer w0.1: P200.4@4.2,30.35 4.298,30.448 P200.4@4.298,30.729 ; v1(14.534,10.5) 14.569,10.465 14.569,8.014 14.569,7.881 15,7.45 15,5.313 14.748,5.061 v1(14.748,5)
  Bottom Layer w0.4: P200.4@4.2,30.65 4.279,30.729 4.279,31.629 v1(4.298,31.648)
RADIO_P40: P200.7 U1.A38 | length 35.6
  Top Layer w0.083: U1.A38@16.575,15 16.658,15.083 16.925,15.083 17.476,15.634 17.72,15.634 17.99,15.904 18.654,15.904 18.75,16 20.4,16
  Top Layer w0.1: 20.4,16 21.814,16 22.196,15.617 22.196,15.281 22.056,15.141 v1@22.056,14.691
  Signal Layer 3 w0.1: v1(6.85,28.75) 7.5,28.1 16.8,28.1 18.5,26.4 18.5,23.25 19.5,22.25 19.5,21.884 20.184,21.2 20.4,21.2 20.85,20.75 20.85,16.9 22.2,15.55 22.2,14.943 22.052,14.794 v1(22.052,14.686)
  Bottom Layer w0.1: P200.7@6.745,27.55 6.831,27.636 6.85,27.655 v1(6.85,28.75)
  Bottom Layer w0.4: P200.7@6.831,27.636 6.831,28.731 v1(6.85,28.75)
RADIO_P41: P200.8 U1.B35 | length 42.8
  Top Layer w0.083: U1.B35@16.075,15.25 16.856,15.25 17.407,15.8 17.651,15.8 17.921,16.07 18.586,16.07 18.689,16.173 20.273,16.173 20.4,16.3
  Top Layer w0.1: 20.4,16.3 20.649,16.549 v1@22.049,16.549
  Signal Layer 3 w0.1: v1(6.7,31.8) 7.6,30.9 15.1,30.9 15.3,30.7 22.15,30.7 23.65,29.2 23.65,28.834 23.366,28.55 20.75,28.55 19.75,27.55 19.75,23.75 21.1,22.4 21.1,21.9 21.85,21.15 21.85,19.6 ; 21.85,19.599 21.65,19.399 21.65,18.5 22.05,18.1 v1(22.05,16.549)
  Bottom Layer w0.1: v1(6.7,31.8) 6.7,30.495 P200.8@6.745,30.45
RADIO_P42: P200.9 U1.A39 | length 30.3
  Top Layer w0.083: U1.A39@16.575,15.5 16.586,15.489 16.861,15.489 17.338,15.966 17.583,15.966 17.852,16.236 18.517,16.236 18.62,16.339 20.129,16.339 20.289,16.5
  Top Layer w0.1: 20.289,16.5 20.788,16.999 v1(21.317,16.999)
  Signal Layer 3 w0.1: v1(8,28.75) 8.4,28.35 16.9,28.35 18.75,26.5 18.75,23.35 19.75,22.35 19.75,21.917 20.217,21.45 20.5,21.45 21.1,20.85 21.1,19.7 21.05,19.65 21.05,17.298 21.317,17.031 v1(21.317,16.999)
  Bottom Layer w0.1: v1(8,28.75) 8,27.565 8.007,27.557 P200.9@8.015,27.55
  Bottom Layer w0.4: P200.9@8,27.45 8.007,27.457 8.007,27.557 8.007,28.743 v1(8,28.75)
RADIO_P43: P200.10 U1.B36 | length 45.5
  Top Layer w0.083: U1.B36@16.075,15.75 16.887,15.75 17.269,16.132 17.514,16.132 17.783,16.402 18.396,16.402 18.499,16.505 19.955,16.505 20.15,16.7
  Top Layer w0.1: 20.15,16.7 20.832,17.382 21.78,17.382 21.792,17.382 22.454,16.72 22.454,15.834 22.792,15.496 v1@22.895,15.496
  Signal Layer 3 w0.1: v1(8,31.8) 8.65,31.15 14.6,31.15 14.65,31.1 15.25,31.1 15.4,30.95 22.3,30.95 23.9,29.35 23.9,28.75 23.45,28.3 20.85,28.3 20,27.45 20,23.85 21.35,22.5 21.35,22 22.1,21.25 22.1,19.566 21.85,19.316 21.85,18.6 22.25,18.2 22.25,17.1 22.45,16.9 22.45,15.934 22.893,15.491 v1(22.9,15.491)
  Bottom Layer w0.1: v1(8,31.8) 8.015,31.785 P200.10@8.015,30.45
RADIO_P44: P200.11 U1.A40 | length 29.1
  Top Layer w0.083: U1.A40@16.575,16 16.902,16 17.201,16.298 17.445,16.298 17.715,16.568 18.312,16.568 18.415,16.671 19.771,16.671 19.975,16.875
  Top Layer w0.1: 19.975,16.875 20.9,17.8 v1(21.45,17.8)
  Signal Layer 3 w0.1: v1(9.1,28.75) 9.208,28.75 9.358,28.6 9.45,28.6 17,28.6 19,26.6 19,23.45 20,22.45 20,21.95 20.3,21.65 20.633,21.65 21.35,20.933 21.35,19.664 21.25,19.564 21.25,18.108 21.45,17.908 v1(21.45,17.8)
  Bottom Layer w0.1: v1(9.1,28.75) 9.1,27.735 9.119,27.716 P200.11@9.285,27.55
  Bottom Layer w0.4: v1(9.1,28.75) 9.119,28.731 9.119,27.716 9.119,27.631 P200.11@9.25,27.5
RADIO_P45: P200.12 U1.B37 | length 44.3
  Top Layer w0.083: U1.B37@16.075,16.25 16.917,16.25 17.132,16.464 17.376,16.464 17.662,16.75 18.259,16.75 18.346,16.837 19.537,16.837 19.608,16.908
  Top Layer w0.1: 19.608,16.908 20.9,18.2 21.65,18.2 22.143,17.707 22.143,17.417 22.713,16.847 22.713,16.36 22.729,16.344 22.729,16.33 22.854,16.204 v1(22.854,16.098)
  Signal Layer 3 w0.1: v1@9.25,31.75 9.3,31.75 9.65,31.4 14.734,31.4 14.834,31.3 15.4,31.3 15.5,31.2 22.4,31.2 24.15,29.45 24.15,28.65 23.513,28.013 20.913,28.013 20.25,27.35 20.25,23.883 21.6,22.533 21.6,22.1 22.35,21.35 22.35,19.55 ; 22.35,19.533 22.05,19.233 22.05,18.683 22.783,17.95 22.816,17.95 23.05,17.716 23.05,17.266 22.7,16.916 22.7,16.584 22.784,16.5 22.784,16.168 v1(22.854,16.098)
  Bottom Layer w0.1: v1(9.25,31.8) 9.25,30.485 P200.12@9.285,30.45
RESET_N: C53.2 R12.1 U1.A31 | length 1.8
  Top Layer w0.083: U1.A31@14.75,12.175 14.75,12.1 14.945,11.905 14.945,11.718 v1(15.025,11.638)
  Bottom Layer w0.127: v1(15.025,11.638) 15.087,11.575 15.087,11.192 15.179,11.1 C53.2@15.2,11.1 ; v1@15.2,11.75 15.3,11.85 15.3,12.104 15.396,12.2 R12.1@15.4,12.2
V_SW: L5.1 U1.B29 | length 4.5
  Top Layer w0.15: U1.B29@15,12.675 15,12.75 15.283,13.033 15.744,13.033 15.944,12.833 16.117,12.833 16.35,12.6
  Top Layer w0.4: 16.383,12.592 16.388,12.592 16.794,12.185 16.794,12.014 17.708,11.1 17.95,11.1 18.15,10.9 L5.1@18.15,10.65
VBCKDC: C10.2 C29.2 C32.2 L5.2 R206.1 R212.1 R224.1 TP2.1 U1.B30 | length 62.7
  Top Layer w0.15: U1.B30@15.5,12.675 15.5,12.65 15.55,12.6 15.873,12.6 16.033,12.44 16.033,12.436 16.2,12.269 16.2,12.15
  Top Layer w0.2: v1@20.65,8.7 20.662,8.688 20.662,8.213 C10.2@20.675,8.2
  Top Layer w0.3: 16.2,12.15 16.2,11.803 16.69,11.313 C32.2@16.69,11.065 ; C32.2@16.7,11.075 16.7,11.055 16.71,11.045 16.955,11.045 17.281,10.719 17.281,10.573 v1(17.319,10.535)
  Top Layer w0.5: v1(5.516,15.4) 5.9,15.4 R212.1@5.95,15.45 ; R224.1@6.8,21.45 v1(6.8,21.9) ; R206.1@14.9,23.75 14.949,23.701 v1(15.334,23.701) ; L5.2@19.75,10.65 19.75,10.6 19.875,10.475 19.875,9.15 19.975,9.05 C29.2@20,9.05 20.15,9.2 20.6,9.2 v1(20.65,9.25) v1(20.65,8.75)
  Signal Layer 3 w0.3: v1(5.516,15.4) 6.353,15.4 6.403,15.35 7.15,15.35 ; v1(6.8,21.9) 6.8,20.25 6.55,20 6.55,19.543 6.65,19.443 6.65,16.735 7.18,16.205 7.18,15.412 ; 7.154,15.358 7.563,14.95 7.856,14.657 8.093,14.657 9.15,13.6 9.15,11.7 8.872,11.422 8.872,10.221 10.543,8.55 16.607,8.55 16.707,8.45 17.15,8.45 17.5,8.8 19.023,8.8 19.073,8.75 v1@20.6,8.75 ; v1(15.334,23.701) 15.358,23.701 15.659,23.4 16.742,23.4 20,20.142 20,16.576 20.553,16.023 20.553,14.2 20.158,13.804 20.158,12.726 20.533,12.35 20.85,12.35 21.78,11.42 21.8,11.4 21.8,10.5 v1@20.65,9.35
  Signal Layer 3 w0.45: v1(17.319,10.535) 17.333,10.535 17.742,10.125 18.131,10.125 18.757,9.5 20.55,9.5 20.64,9.41 20.64,9.26 v1(20.65,9.25)
  Signal Layer 3 w0.5: v1(20.65,8.75) v1@20.65,9.225
  Bottom Layer w0.15: v1(20.65,9.25) 20.661,9.261 21.011,9.261 22.1,10.35 TP2.1@22.1,12.1
  Bottom Layer w0.5: v1(20.65,8.75) v1(20.65,9.25)
VLDO1P8: C30.2 C36.2 TP3.1 U1.A2 U1.B32 | length 15.2
  Top Layer w0.083: U1.B32@16.075,13.75 16.9,13.75
  Top Layer w0.2: U1.A2@15.25,18.85 15.275,18.875 15.275,18.934 15.583,19.242 15.692,19.242 15.94,19.49 16.085,19.49 16.145,19.55 16.205,19.49 16.205,19.276 16.3,19.181 v1(16.3,19.1) ; 16.909,13.75 17.425,13.75 C30.2@17.475,13.7 ; C30.2@17.495,13.7 17.555,13.64 17.555,13.474 17.672,13.357 18.257,13.357 18.393,13.493 18.547,13.493 v1(18.955,13.9)
  Signal Layer 3 w0.2: v1(16.3,19.1) 17.05,18.35 17.05,17.05 18.25,15.85 19.236,15.85 19.5,15.586 19.5,14.8 18.966,14.266 18.966,13.911 v1(18.955,13.9)
  Bottom Layer w0.127: v1(18.955,13.9) 19.056,13.9 19.406,14.25 21.064,14.25 21.314,14 TP3.1@21.55,14
VLDOAFE: C22.2 C205.2 L4.1 U1.B13 | length 9.5
  Top Layer w0.083: v1@9.375,16.775 v1@9.381,16.769 ; v1(9.381,16.567) v1@9.381,16.75 ; U1.B13@10.425,16.75 v1@9.401,16.75 ; v1@9.381,16.75 v1@9.401,16.75 ; v1@9.381,16.75 v1@9.381,16.769 ; v1@9.381,16.769 v1@9.401,16.75
  Top Layer w0.2: C22.2@8.875,16.25 8.895,16.25 9.155,16.51 9.324,16.51 v1(9.381,16.567)
  Top Layer w0.25: C205.2@8.5,19.725 8.5,19.705 8.535,19.67 8.962,19.67 9.082,19.55 v1@9.1,19.55 ; v1(9.1,19.6) L4.1@9.63,19.6
  Signal Layer 3 w0.25: v1(9.1,19.6) 9.075,19.575 9.075,16.941 9.35,16.666 v1@9.35,16.55
  Bottom Layer w0.25: v1(9.1,19.6) 9.075,19.575 9.075,18.213 9.381,17.906 v1(9.381,16.567)
VLDOSOC: C31.2 C33.2 C34.2 C35.2 M1.TPJ9 U1.A18 U1.A34 U1.B2 U1.B38 | length 46.2
  Top Layer w0.083: U1.B2@15,18.325 15,19.077 15.073,19.149 15.124,19.149 15.25,19.275 ; U1.B38@16.075,16.75 16.826,16.75 16.926,16.85 16.95,16.85
  Top Layer w0.15: 15.252,19.276 15.844,19.868 16.073,19.868 16.35,20.145 C34.2@16.35,20.15
  Top Layer w0.18: v1(7.849,13.507) 7.927,13.507 8.185,13.765 8.185,13.93 8.255,14 C35.2@8.275,14 ; C35.2@8.25,13.95 8.25,13.955 8.365,14.07 8.573,14.07 9.468,14.964 9.71,14.964 ; 9.71,14.965 U1.A18@9.9,14.965
  Top Layer w0.2: U1.A18@9.908,14.983 U1.A18@9.925,15
  Top Layer w0.203: C34.2@16.375,20.15 16.395,20.15 16.56,20.315 16.56,20.363 16.703,20.505 17.651,20.505 17.794,20.363 v1(17.874,20.363) ; U1.A34@16.575,13 16.65,13 17.396,12.253 17.396,12.054 C31.2@17.45,12 ; 16.959,16.856 17.161,16.856 17.547,17.242 17.567,17.242 C33.2@17.625,17.3 17.645,17.3 17.703,17.358 17.703,17.531 17.98,17.808 18.366,17.808 18.37,17.812 18.73,17.812 19.15,17.392 v1(19.15,17.378) ; C31.2@17.475,12.05 17.495,12.05 17.553,11.991 17.553,11.798 17.802,11.55 v1@18.9,11.55 ; v1@18.766,11.666 18.786,11.666 18.82,11.7 v1(18.9,11.7)
  Top Layer w0.5: v1(18.9,11.7) v1(19.4,11.7)
  Signal Layer 2 w0.5: v1(18.9,11.7) v1(19.4,11.7)
  Signal Layer 3 w0.3: v1(17.874,20.363) 17.874,19.471 19.15,18.195 v1(19.15,17.378) 19.15,16.431 19.85,15.731 19.85,14.65 19.455,14.255 19.455,11.809 19.4,11.754 v1(19.4,11.7)
  Signal Layer 3 w0.5: v1(18.9,11.7) v1(19.4,11.7)
  Bottom Layer w0.15: v1(19.4,11.7) 19.413,11.7 19.913,12.2 21.05,12.2 21.625,12.775 23.323,12.775 23.597,12.501 M1.TPJ9@27.102,12.501 27.149,12.501 M1.TPJ9@27.2,12.45
  Bottom Layer w0.3: v1(7.849,13.507) 8.606,12.75 16.893,12.75 18.143,11.5 18.646,11.5 18.846,11.7 v1(18.9,11.7) v1@18.95,11.7
  Bottom Layer w0.5: v1@18.95,11.7 v1(19.4,11.7)
VMCU: C19.2 C20.2 C26.2 C27.2 C28.2 C37.2 C39.2 C40.2 C42.2 C208.2 C209.1 M1.TPJ11 R12.2 R207.1 R219.2 R220.1 U1.A3 U1.A26 U1.A30 U1.A33 U1.B8 U1.B14 U1.B31 U1.B33 | length 100.5
  Top Layer w0.083: 9.4,16.192 9.536,16.192 ; 9.45,16.1 9.6,16.25 9.617,16.25 9.651,16.25 U1.B14@10.425,16.25 ; U1.B8@12,18.325 12,19.194 12.35,19.544 12.35,19.575 ; U1.B31@16.075,13.25 16.85,13.25 ; U1.B33@16.075,14.25 16.85,14.25 ; v1(17.725,14.374) C27.2@17.725,14.7
  Top Layer w0.127: U1.A3@14.75,18.825 14.811,18.886 14.811,19.035 14.812,19.036 14.812,19.154 16.406,20.748 16.548,20.748 16.553,20.753 16.678,20.753 C37.2@16.775,20.85
  Top Layer w0.15: v1(11.05,10.5) 11.092,10.542 11.092,10.744 11.266,10.917 11.41,10.917 11.716,11.223 11.716,11.367 11.928,11.579 12.079,11.579 12.25,11.75 U1.A26@12.25,12.175 ; 16.873,14.25 16.987,14.25 17.237,14.5 17.525,14.5 17.62,14.595 17.62,14.615 17.705,14.7 C27.2@17.725,14.7
  Top Layer w0.17: U1.A30@14.25,12.175 14.29,12.135 14.29,11.884 14.291,11.883 14.291,11.837 14.421,11.707 14.421,11.153 v1(14.474,11.1) ; 16.888,13.25 17.005,13.25 17.455,12.8 C39.2@17.475,12.8 17.495,12.8 17.677,12.618 17.677,12.594 17.853,12.418 18.523,12.418 18.578,12.363 18.829,12.363 v1(18.892,12.3) v1@18.904,12.288
  Top Layer w0.2: C37.2@16.795,20.85 16.855,20.91 16.855,21.078 17.075,21.298 v1(17.075,21.326)
  Top Layer w0.203: v1(8.063,15.157) 8.119,15.214 8.314,15.214 8.522,15.422 8.522,15.592 C42.2@8.58,15.65 ; C42.2@8.6,15.65 8.62,15.65 8.678,15.708 8.678,15.728 8.856,15.906 9.173,15.906 9.4,16.133 ; 12.319,19.544 12.875,20.1 C20.2@12.875,20.25 ; C20.2@12.925,20.345 12.983,20.403 13.156,20.403 13.375,20.622 13.375,21.41 13.2,21.585 C19.2@13.2,22.025 ; C19.2@13.2,22.045 13.258,22.103 13.423,22.103 13.67,22.35 v1(13.75,22.35)
  Top Layer w0.25: U1.A33@15.75,12.2 15.75,11.445 16.1,11.095 C28.2@16.1,11.075 ; v1@16.05,9.65 15.7,10 15.7,10.85 15.87,11.02 16.065,11.02 C28.2@16.095,11.05
  Top Layer w0.254: C40.2@11,10.075 11.025,10.1 11.025,10.475 v1(11.05,10.5)
  Top Layer w0.5: v1(7.65,21.6) 7.65,21.2 R207.1@7.7,21.15 ; v1(9.4,10.4) v1(9.9,10.4) ; v1(15.55,9.2) 15.562,9.188 C26.2@15.937,9.188 ; C26.2@16.1,9 16.1,9.025 C26.2@15.937,9.188 ; v1(16.1,9.6) 16.1,9.35 C26.2@15.937,9.188
  Signal Layer 2 w0.5: v1(9.4,10.4) v1(9.9,10.4) ; v1(15.55,9.2) 15.7,9.2 v1(16.1,9.6)
  Signal Layer 3 w0.203: v1(8.063,15.157) 8.143,15.157 8.4,14.9 8.7,14.9
  Signal Layer 3 w0.254: 15.577,19.077 17.068,20.568 17.068,21.32 v1(17.075,21.326) ; 17.55,13.6 17.836,13.314 18.768,13.314 19.052,13.03 19.052,12.526 18.9,12.374 v1@18.9,12.3 ; 17.7,13.85 17.725,13.825
  Signal Layer 3 w0.35: v1(11.05,10.5) 11.091,10.5 11.566,10.975 13.975,10.975 14.089,11.089 14.463,11.089 v1(14.474,11.1)
  Signal Layer 3 w0.356: v1(7.65,21.6) 7.65,19.897 8.55,18.997 8.55,15.778 8.854,15.474 8.854,14.9 10.05,13.704 10.05,11.457 ; 10.207,10.846 10.207,11.457 10.95,12.2 15.6,12.2 16.5,13.1 16.5,13.45 ; v1(11.05,10.5) 11.011,10.5 10.781,10.73 10.119,10.73 10.119,10.658 9.9,10.439 v1(9.9,10.4) 9.928,10.372 9.928,9.972 10.278,9.622 12.131,9.622 12.331,9.422 14.344,9.422 14.588,9.178 15.528,9.178 v1(15.55,9.2) ; v1(13.75,22.35) 13.778,22.322 13.824,22.322 15.121,21.026 15.121,19.533 15.577,19.077 15.922,18.731 16.5,18.153 16.5,13.45 ; v1(17.725,14.374) 17.725,13.825 17.35,13.45 16.5,13.45
  Signal Layer 3 w0.5: v1(9.4,10.4) v1(9.9,10.4) ; v1(15.55,9.2) 15.7,9.2 v1(16.1,9.6)
  Bottom Layer w0.127: v1@14.5,11.15 14.474,11.176 14.474,11.824 14.694,12.044 14.694,12.104 14.79,12.2 R12.2@14.8,12.2
  Bottom Layer w0.15: v1(18.892,12.3) 18.955,12.3 19.155,12.5 20.882,12.5 21.482,13.1 22.5,13.1 23.4,14 25.098,14 M1.TPJ11@25.85,14.752
  Bottom Layer w0.2: C208.2@8.6,9.945 8.6,10.4
  Bottom Layer w0.254: v1(16.1,9.6) 17.125,9.6 17.552,10.027 18.173,10.027 18.557,9.643 19.243,9.643 19.674,10.074 19.674,10.677 19.75,10.753 R220.1@19.75,10.85
  Bottom Layer w0.35: C209.1@9.65,9.75 9.871,9.971 9.871,10.371 v1(9.9,10.4)
  Bottom Layer w0.5: R219.2@2.95,10 6.4,10 6.598,10.198 ; 6.599,10.198 6.801,10.4 8.6,10.4 v1(9.4,10.4) v1(9.9,10.4) ; v1(15.55,9.2) 15.7,9.2 v1(16.1,9.6)
VMCU_IN: C207.2 P201.2 R219.1 | length 3.6
  Bottom Layer w0.2: C207.2@2.075,9.3 2.135,9.24 2.79,9.24 2.8,9.25 R219.1@2.95,9.1
  Bottom Layer w0.508: P201.2@2.95,6.465 R219.1@2.95,9.1
pads on no net: M1.TPJ18 M1.TPJ19 P200.5 P200.6 P200.18 P200.32 P200.33 P200.34 P200.35 P200.36 P200.M1 P200.M2 P201.3 P201.4 P201.5 P201.6 P201.7 P201.8 P201.9 P201.10 P201.11 P201.12 P201.13 P201.14 P201.40 P201.M1 P201.M2 U1.B9 U2.2

## Polygon pours and split planes (outlines as drawn)
GND on Signal Layer 3 "GND_L03_P027" (solid, remove dead copper, pour order 27): -0.065,-0.165 -0.065,34.435 29.935,34.435 29.935,-0.165
GND on Signal Layer 3 "GND_L03_P026" (solid, remove dead copper, pour order 26): 10.75,13 10.75,18 15.75,18 15.75,13
VMCU on Signal Layer 3 "VMCU_L03_P023" (solid, remove dead copper, pour order 23): 9,9.45 10.6,9.45 10.6,12.05 9,12.05
VBCKDC on Signal Layer 3 "VBCKDC_L03_P025" (solid, remove dead copper, pour order 25): 18.6,9.8 20.9,9.8 20.9,8.5 18.6,8.5
GND on Bottom Layer "GND_L04_P024" (solid, remove dead copper, pour order 24): 0,0 0,34.6 30,34.6 30,0
GND on Bottom Layer "GND_L04_P020" (solid, remove dead copper, pour order 20): 10.5,12.75 10.5,18.25 14,18.25 14,16.25 16,16.25 16,12.75
GND on Signal Layer 2 "GND_L02_P022" (solid, remove dead copper, pour order 22): 0,0 0,34.6 30,34.6 30,0
GND on Top Layer "GND_L01_P019" (solid, remove dead copper, pour order 19): 0,0 0,34.6 30,34.6 30,0

## Other copper
Top Layer:
  rectangle net GND: 11.2,19.7 11.7,21.05
  rectangle net VBCKDC: 20.25,8.625 20.7,9.475
  pour cut-out: 18.45,7.875 cw(c18.45,8.25) 18.075,8.25 19.325,8.25 cw(c18.95,8.25) 18.95,7.875
  pour cut-out: 9.85,22.3 9.85,22.95 ccw(c9.6,22.95) 9.6,23.2 9.25,23.2 9.25,23.9 9.75,23.9 9.75,24.5 cw(c9.85,24.5) 9.85,24.6 11.65,24.6 cw(c11.65,24.5) 11.75,24.5 11.75,22.45 cw(c11.6,22.45) 11.6,22.3
  pour cut-out: 12.55,7.65 cw(c12.55,7.75) 12.45,7.75 12.45,9.55 cw(c12.55,9.55) 12.55,9.65 15.15,9.65 cw(c15.15,9.55) 15.25,9.55 15.25,7.75 cw(c15.15,7.75) 15.15,7.65
  pour cut-out: 4.5,18.7 cw(c4.6,18.7) 4.6,18.8 6.8,18.8 cw(c6.8,18.7) 6.9,18.7 6.9,16.1 cw(c6.8,16.1) 6.8,16 4.6,16 cw(c4.6,16.1) 4.5,16.1
  pour cut-out: 12.475,24.4 cw(c12.475,24.75) 12.125,24.75 12.125,25.85 cw(c12.475,25.85) 12.475,26.2 12.975,26.2 cw(c12.975,25.85) 13.325,25.85 13.325,24.75 cw(c12.975,24.75) 12.975,24.4
  pour cut-out: 9.3,20.425 10.05,20.425 10.05,20.8 9.875,20.8 9.875,22.45 11.175,22.45 11.175,19.575 9.3,19.575
  pour cut-out: 11.825,23 12.2,23 12.375,22.825 12.375,21.025 12.7,21.025 12.7,19.875 11.7,19.55 11.7,21.075
  region net NetANT1_1: 12.225,34.825 12.475,34.5 12.975,34.5 13.225,34.825 13.225,34.85 12.225,34.85
  pour cut-out: 12.3,29.9 12.3,34.55 13.15,34.55 13.15,29.9
  pour cut-out: 6.9,17.85 6.9,17.3 9.4,17.3 9.4,17.85
  pour cut-out: 18.32,11.441 18.32,9.859 19.6,9.859 19.6,11.441
  pour cut-out: 10.95,17.8 15.543,17.8 15.543,13.214 15.529,13.2 15.496,13.233 10.95,13.233
Signal Layer 2:
  pour cut-out: 19.025,33.35 16.875,33.35 16.875,33.125 15.625,33.125 15.625,32.025 16.875,32.025 16.875,31.8 19.025,31.8

## Silkscreen, mask and mechanical layers (free items; w line width, h text height)
Top Overlay:
  text ".family_name" at 17,42 h3.2
  text ".silk_line_1" at 17,39.6 h1.9
  text ".silk_line_2" at 17,37.426 h1.9
  text ".silk_line_3" at 17,35.23 h1.9
  text "ISP" at 24.967,5.396 h1.9
Bottom Overlay:
  text "40" at 27.87,32.317 h1.52
  text "2" at 2.201,32.3 h1.52
  text "1" at 2.2,25 h1.52
  text "39" at 28.3,25.017 h1.52
  text "40" at 28.3,8.017 h1.52
  text "2" at 2.501,7.9 h1.52
  text "PCB'.pcb_var' Rev '.pcb_rev'" at 28.5,7 h1.2 r270
  text "1" at 2.6,0.8 h1.52
  text "39" at 28.3,0.817 h1.52
Top Solder:
  the board outline again, w0.6
Bottom Solder:
  rectangle: 10.95,13.2 14.1,17.8
  rectangle: 10.95,13.2 15.55,16.45
  lines w0.6: 0,1.2 ccw(c1.2,1.2) 1.2,0 28.8,0 ccw(c28.8,1.2) 30,1.2 30,43.8 ccw(c28.8,43.8) 28.8,45 1.2,45 ccw(c1.2,43.8) 0,43.8 0,1.2
Drill Guide:
  lines w0.01: 26.36,-4.9 26.37,-4.89
BOARD OUTLINE 1:
  the board outline again, w0.1
Top Courtyard:
  lines w0.1: -0.5,0 0.5,0 ; 0,-0.5 0,0.5
Bottom Courtyard:
  lines w0.1: -0.5,0 0.5,0 ; 0,-0.5 0,0.5

## Text inside footprints (layer, text, board x,y; h text height)
BTN100: Top Pin marking "4" at 26.743,1.73 h0.5; Top Pin marking "2" at 26.773,3.947 h0.5; Top Pin marking "3" at 21.054,1.705 h0.5; Top Pin marking "1" at 21.115,3.998 h0.5
J1: Top Pin marking "3" at 17.83,35.154 h0.5 r180; Top Pin marking "2" at 17.83,30.328 h0.5 r180